# Altium PCB PCI Express_16765X6890_64PIN_Low profile_Clear.PCBDOC (part 3 of 9)
Units mm, origin at the board's own origin, x right, y up, seen from the top; angles counter-clockwise.
Board outline 80.71 x 137.84 mm, 6 copper layers (Top Layer, Layer 2 (GND), Layer 3, Layer 4, Layer 5 (AGND), Bottom Layer), stack 1.571 mm thick; 507 components, 297 nets, 1544 pads, 616 vias.
Unrouted connection lines stored in the file: 101.
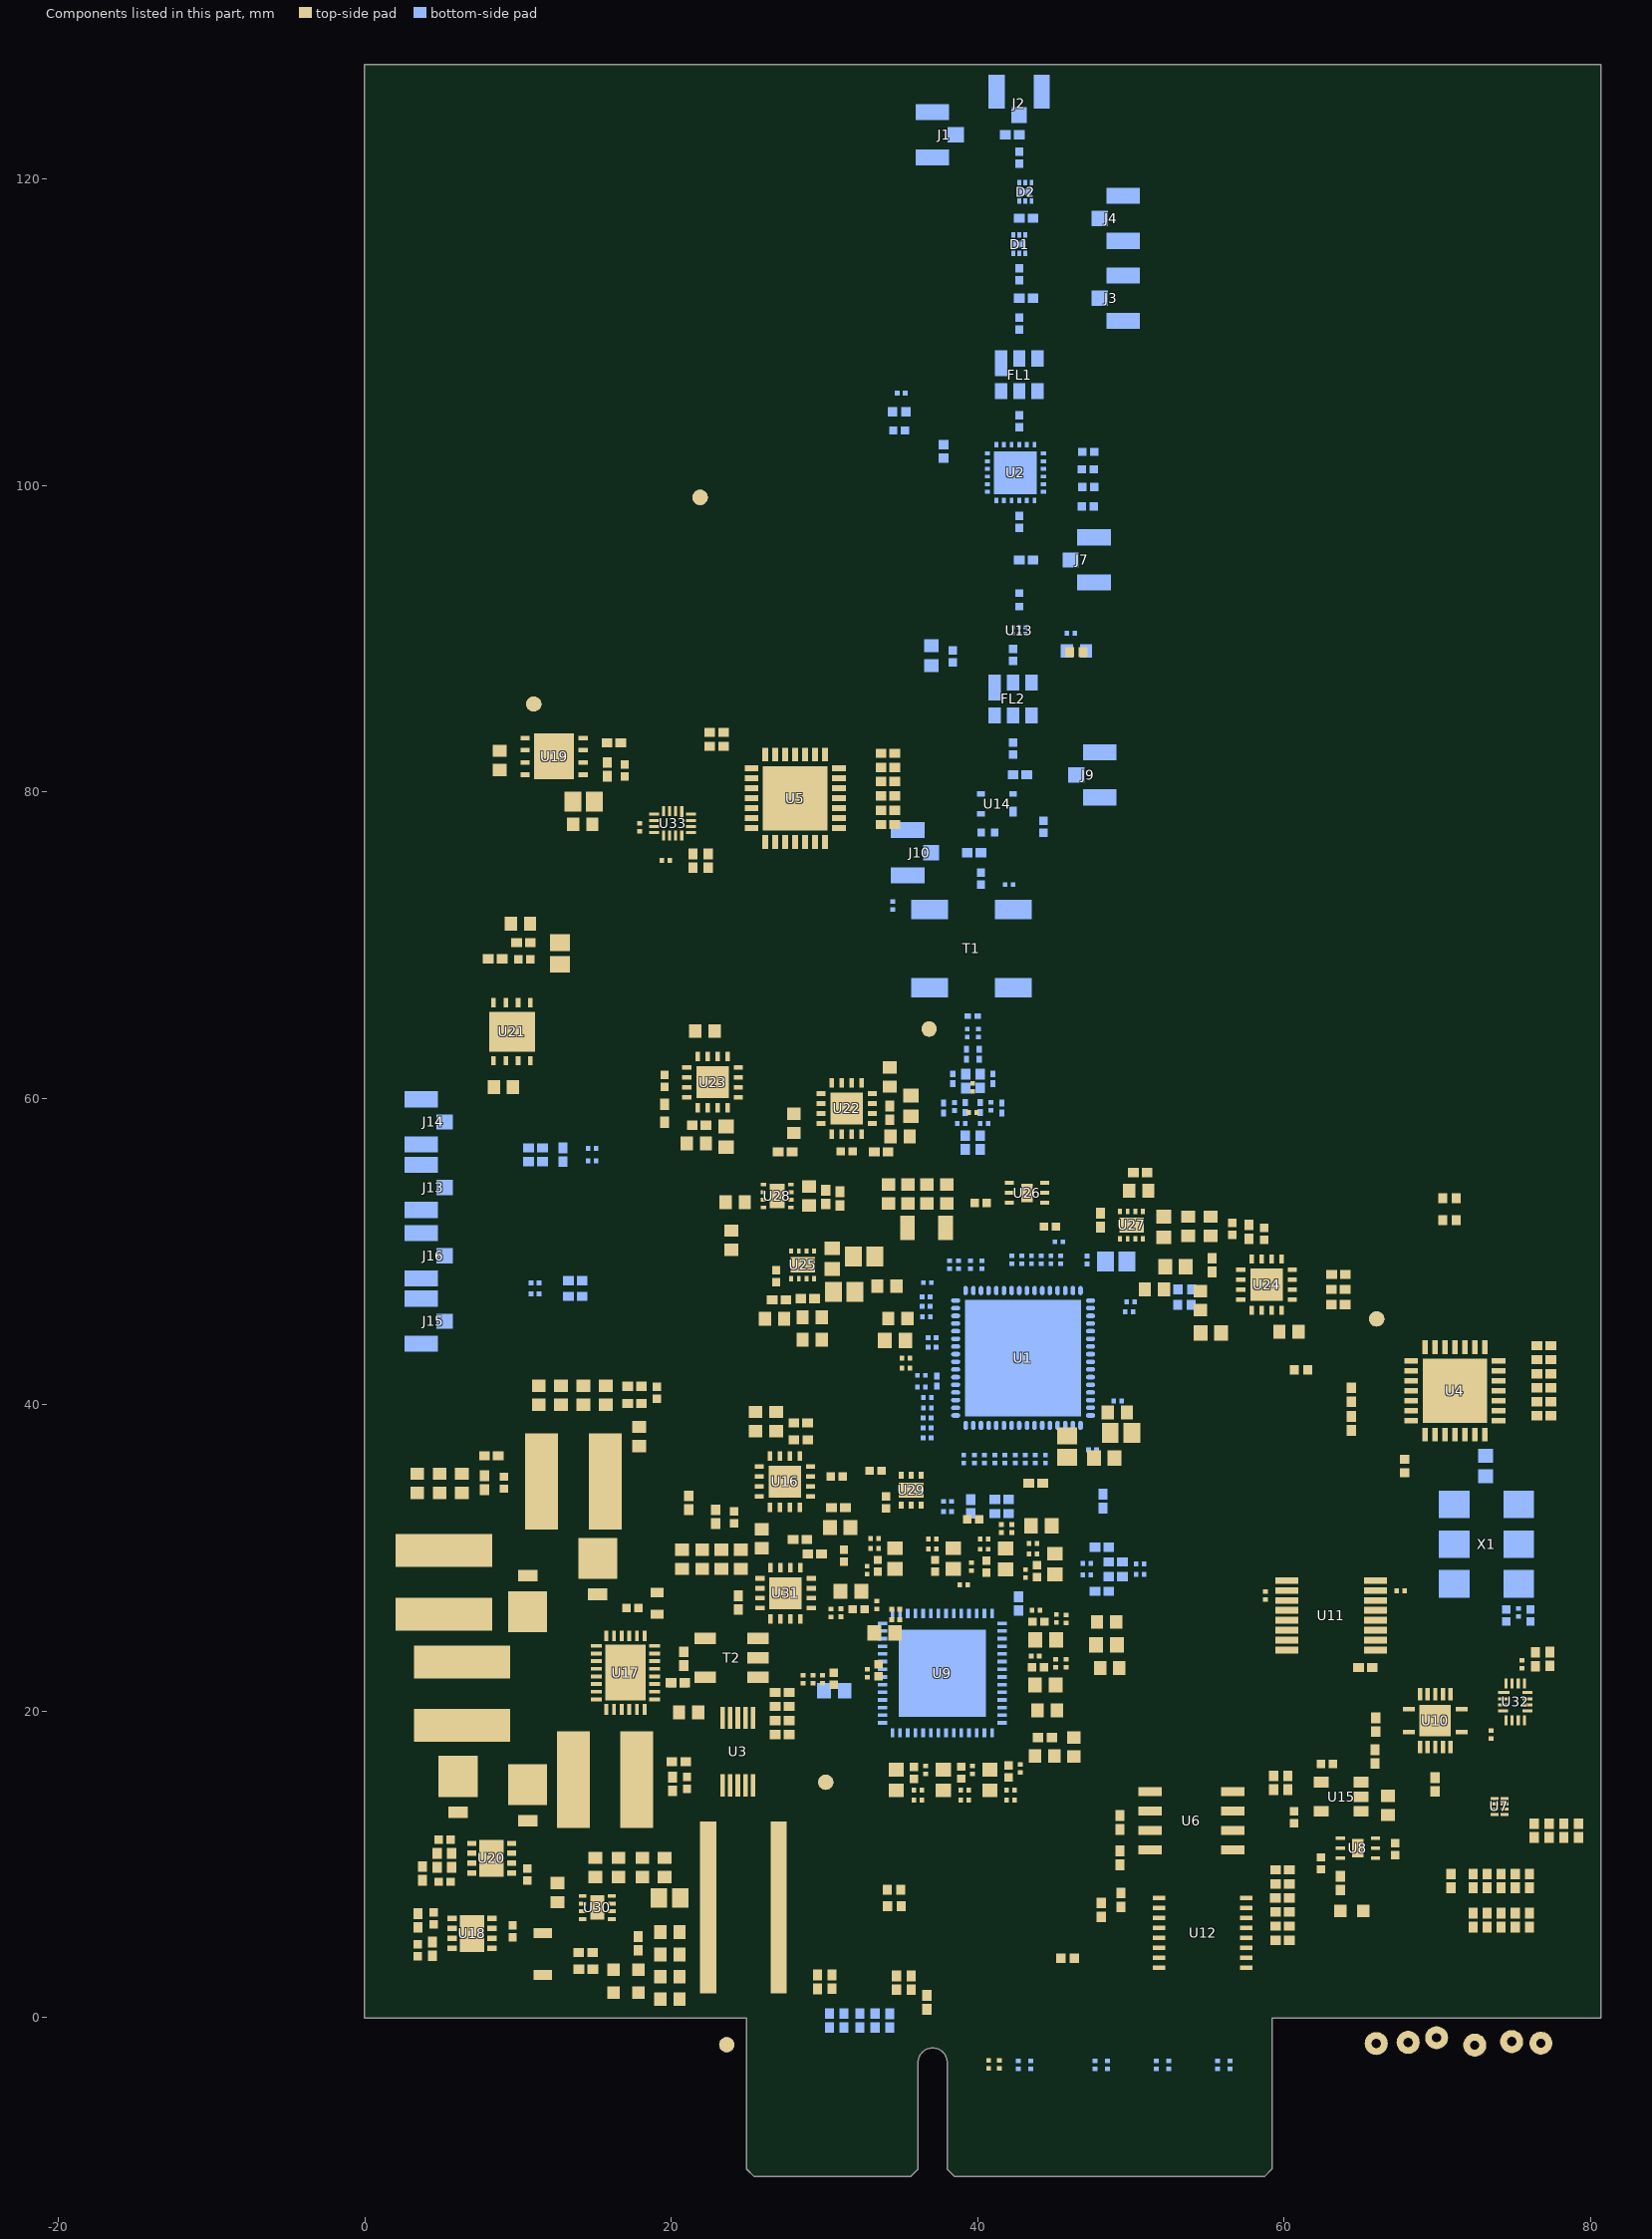
[diagram p4: the components of this part, seen from the top]

## Part data (continued)
C66: library part Capacitor, Case/Package=0402, Case Code (Metric)=1005, Dielectric=X7R, Manufacturer 1=Samsung, Manufacturer Part Number 1=CL05B681KB5NNNC, Max Operating Temperature=125°C, Min Operating Temperature=-55°C, Package Quantity=1, Supplier Part Number 1=1276-1583-1-ND, Tolerance=10%, Voltage Rating=50V, Capacitance=680pF, Case Code (Imperial)=0402, ComponentLink1Description=https://datasheet.ciiva.com/16428/cl05b681kb5nnnc-16428786.pdf?src-supplier=Future+Electronics, ComponentLink1URL=https://datasheet.ciiva.com/16428/cl05b681kb5nnnc-16428786.pdf?src-supplier=Future+Electronics, ComponentLink2Description=https://datasheet.ciiva.com/25789/cl05b681kb5nnnc-25789493.pdf?src-supplier=Digi-Key, ComponentLink2URL=https://datasheet.ciiva.com/25789/cl05b681kb5nnnc-25789493.pdf?src-supplier=Digi-Key, ComponentLink3Description=https://datasheet.ciiva.com/29198/458344-da-01-en-vs-kondensator-0402-29198504.pdf?src-supplier=Conrad, ComponentLink3URL=https://datasheet.ciiva.com/29198/458344-da-01-en-vs-kondensator-0402-29198504.pdf?src-supplier=Conrad, Depth=0.5mm, Height=0.5mm, Length=1mm, Material=Ceramic, Mount="Surface Mount", Packaging="Tape and Reel", Pricing 1="1=0.10000, 10=0.03200, 100=0.01420, 500=0.01012, 1000=0.00795, 2500=0.00722, 5000=0.00665 (USD)", Radiation Hardening=No, RoHS=Yes, Stock 1=1154024, Supplier 1=Digi-Key, Thickness=0.022inch, Width=0.02inch
C67: library part Capacitor, Case/Package=0603, Case Code (Metric)=1608, Dielectric=X7R, Dielectric Material=Ceramic, Manufacturer 1=TDK, Manufacturer Part Number 1=C1608X7R1C105K080AC, Max Operating Temperature=125°C, Min Operating Temperature=-55°C, Package Quantity=1, Supplier Part Number 1=445-1604-1-ND, Tolerance=10%, Voltage=16V, Capacitance=1uF, Case Code (Imperial)=0603, ComponentLink1Description=https://datasheet.ciiva.com/22648/1796654-22648704.pdf?src-supplier=Element14, ComponentLink1URL=https://datasheet.ciiva.com/22648/1796654-22648704.pdf?src-supplier=Element14, ComponentLink2Description=https://datasheet.ciiva.com/11788/0900766b80c1bb00-11788075.pdf?src-supplier=RSComponents, ComponentLink2URL=https://datasheet.ciiva.com/11788/0900766b80c1bb00-11788075.pdf?src-supplier=RSComponents, ComponentLink3Description=https://datasheet.ciiva.com/6250/tdkmlcccaprange-6250871.pdf?src-supplier=Digi-Key, ComponentLink3URL=https://datasheet.ciiva.com/6250/tdkmlcccaprange-6250871.pdf?src-supplier=Digi-Key, ComponentLink4Description=https://datasheet.ciiva.com/16199/e412-c-16199815.pdf?src-supplier=Future+Electronics, ComponentLink4URL=https://datasheet.ciiva.com/16199/e412-c-16199815.pdf?src-supplier=Future+Electronics, ComponentLink5Description=https://datasheet.ciiva.com/6156/1571323-6156168.pdf?src-supplier=Farnell, ComponentLink5URL=https://datasheet.ciiva.com/6156/1571323-6156168.pdf?src-supplier=Farnell, ComponentLink6Description=https://datasheet.ciiva.com/48671/e412-c-48671305.pdf?src-supplier=Avnet, ComponentLink6URL=https://datasheet.ciiva.com/48671/e412-c-48671305.pdf?src-supplier=Avnet, ComponentLink7Description=https://datasheet.ciiva.com/26285/3025c1608x7r1c105k080ac-26285242.pdf?src-supplier=Onlinecomponents.com, ComponentLink7URL=https://datasheet.ciiva.com/26285/3025c1608x7r1c105k080ac-26285242.pdf?src-supplier=Onlinecomponents.com, ComponentLink8Description=https://datasheet.ciiva.com/22749/1744655-22749595.pdf?src-supplier=Element14, ComponentLink8URL=https://datasheet.ciiva.com/22749/1744655-22749595.pdf?src-supplier=Element14, ComponentLink9Description=https://datasheet.ciiva.com/15192/getdatasheetpartid-715881-15192029.pdf?src-supplier=Verical, ComponentLink9URL=https://datasheet.ciiva.com/15192/getdatasheetpartid-715881-15192029.pdf?src-supplier=Verical, ComponentLink10Description=https://datasheet.ciiva.com/17487/e412-c-17487343.pdf?src-supplier=Avnet+Europe, ComponentLink10URL=https://datasheet.ciiva.com/17487/e412-c-17487343.pdf?src-supplier=Avnet+Europe, ComponentLink11Description=https://datasheet.ciiva.com/22694/1796654-22694127.pdf?src-supplier=Element14, ComponentLink11URL=https://datasheet.ciiva.com/22694/1796654-22694127.pdf?src-supplier=Element14, Composition=Ceramic, Depth=0.8mm, Height=0.8mm, Lead Free="Lead Free", Length=1.6mm, Mount="Surface Mount", Packaging="Tape and Reel", Pricing 1="1=0.15000, 10=0.10500, 100=0.04950, 500=0.03472, 1000=0.02875 (USD)", Radiation Hardening=No, REACH SVHC="No SVHC", RoHS=Yes, Stock 1=314791, Supplier 1=Digi-Key, Termination=SMD/SMT, Thickness=0.037inch, Voltage Rating=16V, Voltage Rating (DC)=16V, Weight=7.1E-05oz, Width=0.031inch
C68 C74: library part Capacitor, Case/Package=0805, Case Code (Metric)=2012, Dielectric=X5R, Dielectric Material=Ceramic, Manufacturer 1=KEMET, Manufacturer Part Number 1=C0805C106K8PACTU, Max Operating Temperature=85°C, Min Operating Temperature=-55°C, Package Quantity=1, Supplier Part Number 1=399-4925-1-ND, Tolerance=10%, Voltage=10V, Capacitance=10uF, Case Code (Imperial)=0805, ComponentLink1Description=https://datasheet.ciiva.com/7842/1732709-7842198.pdf?src-supplier=Element14, ComponentLink1URL=https://datasheet.ciiva.com/7842/1732709-7842198.pdf?src-supplier=Element14, ComponentLink2Description=https://datasheet.ciiva.com/22704/1732709-22704859.pdf?src-supplier=Element14, ComponentLink2URL=https://datasheet.ciiva.com/22704/1732709-22704859.pdf?src-supplier=Element14, Contact Plating=Tin,Matte, Depth=1.25mm, Dissipation Factor=10%, Height=1.25mm, Length=2mm, Mount="Surface Mount", Number of Pins=2, Packaging="Tape and Reel", Pricing 1="1=0.16000, 10=0.11700, 100=0.05500, 500=0.03858, 1000=0.03194 (USD)", Radiation Hardening=No, REACH SVHC="No SVHC", RoHS=Yes, Stock 1=697277, Supplier 1=Digi-Key, Termination=SMD/SMT, Thickness=0.055inch, Voltage Rating=10V, Voltage Rating (DC)=10V, Width=1.2mm
C71 C75: library part Capacitor, Case/Package=0603, Case Code (Metric)=1608, Dielectric=C0G, Manufacturer 1=Murata, Manufacturer Part Number 1=GRM1885C1H103JA01D, Max Operating Temperature=125°C, Min Operating Temperature=-55°C, Package Quantity=4000, Supplier Part Number 1=490-9666-1-ND, Tolerance=5%, Voltage=50V, Capacitance=10nF, Case Code (Imperial)=0603, ComponentLink1Description=https://datasheet.ciiva.com/29537/partnumbering-e-01-29537910.pdf?src-supplier=Digi-Key, ComponentLink1URL=https://datasheet.ciiva.com/29537/partnumbering-e-01-29537910.pdf?src-supplier=Digi-Key, ComponentLink2Description=https://datasheet.ciiva.com/41860/partnumbering-e-01-41860759.pdf?src-supplier=Digi-Key, ComponentLink2URL=https://datasheet.ciiva.com/41860/partnumbering-e-01-41860759.pdf?src-supplier=Digi-Key, Depth=0.8mm, Height=0.8mm, Lead Free="Lead Free", Lead Pitch=0.5mm, Length=1.6mm, Material=Ceramic, Mount="Surface Mount", Packaging="Tape and Reel", Pricing 1="1=0.20000, 10=0.13500, 100=0.06820, 500=0.04664, 1000=0.04126 (USD)", REACH SVHC="No SVHC", RoHS=Yes, Stock 1=1084376, Supplier 1=Digi-Key, Termination=SMD/SMT, Thickness=0.035inch, Voltage Rating=50V, Voltage Rating (DC)=50V, Width=0.8mm
C72: library part Capacitor, Case/Package=0402, Case Code (Metric)=1005, Dielectric=X7R, Manufacturer 1=Samsung, Manufacturer Part Number 1=CL05B152KB5NNNC, Max Operating Temperature=125°C, Min Operating Temperature=-55°C, Package Quantity=1, Supplier Part Number 1=1276-1521-1-ND, Tolerance=10%, Voltage=50V, Capacitance=1.5nF, Case Code (Imperial)=0402, ComponentLink1Description=https://datasheet.ciiva.com/16498/cl05b152kb5nnnc-16498493.pdf?src-supplier=Future+Electronics, ComponentLink1URL=https://datasheet.ciiva.com/16498/cl05b152kb5nnnc-16498493.pdf?src-supplier=Future+Electronics, ComponentLink2Description=https://datasheet.ciiva.com/15195/getdatasheetpartid-543173-15195639.pdf?src-supplier=Verical, ComponentLink2URL=https://datasheet.ciiva.com/15195/getdatasheetpartid-543173-15195639.pdf?src-supplier=Verical, ComponentLink3Description=https://datasheet.ciiva.com/29198/459134-da-01-en-vs-kondensator-0402-29198336.pdf?src-supplier=Conrad, ComponentLink3URL=https://datasheet.ciiva.com/29198/459134-da-01-en-vs-kondensator-0402-29198336.pdf?src-supplier=Conrad, ComponentLink4Description=https://datasheet.ciiva.com/26309/mlcc-catalogdownload2013-eng-26309021.pdf?src-supplier=Distrelec, ComponentLink4URL=https://datasheet.ciiva.com/26309/mlcc-catalogdownload2013-eng-26309021.pdf?src-supplier=Distrelec, Contact Plating=Tin, Depth=0.5mm, Height=0.5mm, Length=1mm, Material=Ceramic, Mount="Surface Mount", Packaging="Tape and Reel", Pricing 1="1=0.10000, 10=0.02300, 100=0.01010, 500=0.00720, 1000=0.00566, 2500=0.00514, 5000=0.00473 (USD)", Radiation Hardening=No, RoHS=Yes, Stock 1=792853, Supplier 1=Digi-Key, Thickness=0.022inch, Voltage Rating=50V, Width=0.02inch
C90 C91 C135 C140 C141: library part Capacitor, Case/Package=0805, Case Code (Metric)=2012, Dielectric=X5R, Manufacturer 1=Murata, Manufacturer Part Number 1=GRM21BR61C106KE15L, Max Operating Temperature=85°C, Min Operating Temperature=-55°C, Package Quantity=1, Supplier Part Number 1=490-3886-1-ND, Tolerance=10%, Voltage=16V, Capacitance=10uF, Case Code (Imperial)=0805, ComponentLink1Description=https://datasheet.ciiva.com/2989/product-2989696.pdf?src-supplier=Avnet, ComponentLink1URL=https://datasheet.ciiva.com/2989/product-2989696.pdf?src-supplier=Avnet, ComponentLink2Description=https://datasheet.ciiva.com/3777/1956grm21br61c106ke1523-3777137.pdf?src-supplier=Arrow, ComponentLink2URL=https://datasheet.ciiva.com/3777/1956grm21br61c106ke1523-3777137.pdf?src-supplier=Arrow, ComponentLink3Description=https://datasheet.ciiva.com/7719/1747468-7719090.pdf?src-supplier=Element14, ComponentLink3URL=https://datasheet.ciiva.com/7719/1747468-7719090.pdf?src-supplier=Element14, ComponentLink4Description=https://datasheet.ciiva.com/23628/460993-23628598.pdf?src-supplier=Newark, ComponentLink4URL=https://datasheet.ciiva.com/23628/460993-23628598.pdf?src-supplier=Newark, ComponentLink5Description=https://datasheet.ciiva.com/29202/450891-da-01-de-vs-chip-kond-0805-10-0-uf-10pr-16-0v-x5r-29202696.pdf?src-supplier=Conrad, ComponentLink5URL=https://datasheet.ciiva.com/29202/450891-da-01-de-vs-chip-kond-0805-10-0-uf-10pr-16-0v-x5r-29202696.pdf?src-supplier=Conrad, ComponentLink6Description=https://datasheet.ciiva.com/29199/454607-da-01-en-vs-kondensator-0805-29199611.pdf?src-supplier=Conrad, ComponentLink6URL=https://datasheet.ciiva.com/29199/454607-da-01-en-vs-kondensator-0805-29199611.pdf?src-supplier=Conrad, ComponentLink7Description=https://datasheet.ciiva.com/2989/product-2989697.pdf?src-supplier=Avnet, ComponentLink7URL=https://datasheet.ciiva.com/2989/product-2989697.pdf?src-supplier=Avnet, ComponentLink8Description=https://datasheet.ciiva.com/137/partnumbering-e-01-137917.pdf?src-supplier=Digi-Key, ComponentLink8URL=https://datasheet.ciiva.com/137/partnumbering-e-01-137917.pdf?src-supplier=Digi-Key, ComponentLink9Description=https://datasheet.ciiva.com/137/partnumbering-e-01-137918.pdf?src-supplier=Digi-Key, ComponentLink9URL=https://datasheet.ciiva.com/137/partnumbering-e-01-137918.pdf?src-supplier=Digi-Key, Depth=1.25mm, Height=1.25mm, Lead Free="Lead Free", Length=2mm, Material=Ceramic, Mount="Surface Mount", Packaging="Tape and Reel", Pricing 1="1=0.32000, 10=0.21600, 100=0.12240, 500=0.08640, 1000=0.07560 (USD)", Radiation Hardening=No, REACH SVHC="No SVHC", RoHS=Yes, Stock 1=3969960, Supplier 1=Digi-Key, Termination=SMD/SMT, Thickness=0.053inch, Voltage Rating=16V, Voltage Rating (DC)=16V, Width=1.25mm
C92 C126 C142: library part Capacitor, Case/Package=0603, Case Code (Metric)=1608, Dielectric=X7R, Dielectric Material=Ceramic, Manufacturer 1="Kyocera AVX", Manufacturer Part Number 1=06031C222JAT2A, Max Operating Temperature=125°C, Min Operating Temperature=-55°C, Package Quantity=1, Supplier Part Number 1=478-3705-1-ND, Tolerance=5%, Voltage=100V, Capacitance=2.2nF, Case Code (Imperial)=0603, ComponentLink1Description=https://datasheet.ciiva.com/151/cx7r-151603.pdf?src-supplier=Digi-Key, ComponentLink1URL=https://datasheet.ciiva.com/151/cx7r-151603.pdf?src-supplier=Digi-Key, ComponentLink2Description=https://datasheet.ciiva.com/151/cx7r-151604.pdf?src-supplier=Digi-Key, ComponentLink2URL=https://datasheet.ciiva.com/151/cx7r-151604.pdf?src-supplier=Digi-Key, ComponentLink3Description=https://datasheet.ciiva.com/151/cx7r-151605.pdf?src-supplier=Digi-Key, ComponentLink3URL=https://datasheet.ciiva.com/151/cx7r-151605.pdf?src-supplier=Digi-Key, ComponentLink4Description=https://datasheet.ciiva.com/2987/cx7r-2987738.pdf?src-supplier=Avnet, ComponentLink4URL=https://datasheet.ciiva.com/2987/cx7r-2987738.pdf?src-supplier=Avnet, ComponentLink5Description=https://datasheet.ciiva.com/46383/1818074-46383885.pdf?src-supplier=Element14, ComponentLink5URL=https://datasheet.ciiva.com/46383/1818074-46383885.pdf?src-supplier=Element14, ComponentLink6Description=https://datasheet.ciiva.com/22619/1679506-22619839.pdf?src-supplier=Element14, ComponentLink6URL=https://datasheet.ciiva.com/22619/1679506-22619839.pdf?src-supplier=Element14, ComponentLink7Description=https://datasheet.ciiva.com/16287/cx7r-16287705.pdf?src-supplier=Future+Electronics, ComponentLink7URL=https://datasheet.ciiva.com/16287/cx7r-16287705.pdf?src-supplier=Future+Electronics, ComponentLink8Description=https://datasheet.ciiva.com/11538/cx7r-11538250.pdf?src-supplier=Avnet, ComponentLink8URL=https://datasheet.ciiva.com/11538/cx7r-11538250.pdf?src-supplier=Avnet, ComponentLink9Description=https://datasheet.ciiva.com/5415/cx7r-218113-5415421.pdf?src-supplier=Mouser, ComponentLink9URL=https://datasheet.ciiva.com/5415/cx7r-218113-5415421.pdf?src-supplier=Mouser, ComponentLink10Description=https://datasheet.ciiva.com/14595/70001075-14595151.pdf?src-supplier=Allied+Electronics, ComponentLink10URL=https://datasheet.ciiva.com/14595/70001075-14595151.pdf?src-supplier=Allied+Electronics, Contact Plating=Tin,Matte, Depth=0.81mm, Dissipation Factor=2.5%, Height=0.9mm, Lead Free="Lead Free", Length=1.6mm, Mount="Surface Mount,PCB", Number of Pins=2, Packaging="Tape and Reel", Pricing 1="1=0.24000, 10=0.16800, 100=0.09500, 500=0.06708, 1000=0.05870 (USD)", Radiation Hardening=No, REACH SVHC="No SVHC", RoHS=Yes, Stock 1=13864, Supplier 1=Digi-Key, Termination=SMD/SMT, Thickness=0.035inch, Voltage Rating=100V, Voltage Rating (DC)=100V, Width=0.032inch
C94 C95 C237 C238: library part Capacitor, Case/Package=0402, Case Code (Metric)=1005, Dielectric=X5R, Manufacturer 1=Samsung, Manufacturer Part Number 1=CL05A474KP5NNNC, Max Operating Temperature=85°C, Min Operating Temperature=-55°C, Supplier Part Number 1=1276-1173-1-ND, Tolerance=10%, Voltage Rating=10V, Capacitance=470nF, Case Code (Imperial)=0402, ComponentLink1Description=https://datasheet.ciiva.com/25710/cl05a474kp5nnnc-25710324.pdf?src-supplier=Digi-Key, ComponentLink1URL=https://datasheet.ciiva.com/25710/cl05a474kp5nnnc-25710324.pdf?src-supplier=Digi-Key, ComponentLink2Description=https://datasheet.ciiva.com/26838/getdatasheetpartid-355286-26838191.pdf?src-supplier=Verical, ComponentLink2URL=https://datasheet.ciiva.com/26838/getdatasheetpartid-355286-26838191.pdf?src-supplier=Verical, ComponentLink3Description=https://datasheet.ciiva.com/16437/cl05b104kq5nnnc-16437351.pdf?src-supplier=Future+Electronics, ComponentLink3URL=https://datasheet.ciiva.com/16437/cl05b104kq5nnnc-16437351.pdf?src-supplier=Future+Electronics, Depth=0.5mm, Height=0.5mm, Lead Free="Lead Free", Length=1mm, Mount="Surface Mount", Packaging="Tape and Reel", Pricing 1="1=0.10000, 10=0.07000, 100=0.03140, 500=0.02240, 1000=0.01761, 2500=0.01600, 5000=0.01472 (USD)", Radiation Hardening=No, RoHS=Yes, Stock 1=1267992, Supplier 1=Digi-Key, Thickness=0.022inch, Voltage Rating (DC)=10V, Width=0.02inch
C96 C128 C170: library part Capacitor, Case/Package=0402, Case Code (Metric)=1005, Dielectric=X5R, Dielectric Material=Ceramic, Manufacturer 1=Yageo, Manufacturer Part Number 1=CC0402KRX5R5BB105, Max Operating Temperature=85°C, Min Operating Temperature=-55°C, Package Quantity=1, Supplier Part Number 1=311-1438-1-ND, Tolerance=10%, Voltage Rating=6.3V, Capacitance=1uF, Case Code (Imperial)=0402, ComponentLink1Description=https://datasheet.ciiva.com/5789/70765-5789520.pdf?src-supplier=Farnell, ComponentLink1URL=https://datasheet.ciiva.com/5789/70765-5789520.pdf?src-supplier=Farnell, ComponentLink2Description=https://datasheet.ciiva.com/176/mlccorderingcode-176611.pdf?src-supplier=Digi-Key, ComponentLink2URL=https://datasheet.ciiva.com/176/mlccorderingcode-176611.pdf?src-supplier=Digi-Key, ComponentLink3Description=https://datasheet.ciiva.com/8033/1525783-8033643.pdf?src-supplier=Element14, ComponentLink3URL=https://datasheet.ciiva.com/8033/1525783-8033643.pdf?src-supplier=Element14, ComponentLink4Description=https://datasheet.ciiva.com/16624/upy-gphc-x5r-4v-to-50v-12-16624731.pdf?src-supplier=Avnet+Europe, ComponentLink4URL=https://datasheet.ciiva.com/16624/upy-gphc-x5r-4v-to-50v-12-16624731.pdf?src-supplier=Avnet+Europe, ComponentLink5Description=https://datasheet.ciiva.com/28450/1359354-28450285.pdf?src-supplier=Element14, ComponentLink5URL=https://datasheet.ciiva.com/28450/1359354-28450285.pdf?src-supplier=Element14, ComponentLink6Description=https://datasheet.ciiva.com/11464/upy-gphc-x5r-4v-to-50v-12-11464863.pdf?src-supplier=Avnet, ComponentLink6URL=https://datasheet.ciiva.com/11464/upy-gphc-x5r-4v-to-50v-12-11464863.pdf?src-supplier=Avnet, ComponentLink7Description=https://datasheet.ciiva.com/176/mlccorderingcode-176609.pdf?src-supplier=Digi-Key, ComponentLink7URL=https://datasheet.ciiva.com/176/mlccorderingcode-176609.pdf?src-supplier=Digi-Key, ComponentLink8Description=https://datasheet.ciiva.com/176/mlccorderingcode-176610.pdf?src-supplier=Digi-Key, ComponentLink8URL=https://datasheet.ciiva.com/176/mlccorderingcode-176610.pdf?src-supplier=Digi-Key, ComponentLink9Description=https://datasheet.ciiva.com/8033/1525783-8033644.pdf?src-supplier=Element14, ComponentLink9URL=https://datasheet.ciiva.com/8033/1525783-8033644.pdf?src-supplier=Element14, ComponentLink10Description=https://datasheet.ciiva.com/8033/70765-8033646.pdf?src-supplier=Element14, ComponentLink10URL=https://datasheet.ciiva.com/8033/70765-8033646.pdf?src-supplier=Element14, Composition=Ceramic, Depth=0.5mm, Halogen Free="Halogen Free", Height=0.5mm, Lead Free="Lead Free", Length=1mm, Mount="Surface Mount", Number of Pins=2, Packaging="Tape and Reel", Radiation Hardening=No, REACH SVHC="No SVHC", RoHS=Yes, Supplier 1=Digi-Key, Termination=SMD/SMT, Thickness=0.022inch, Voltage Rating (DC)=6.3V, Width=0.02inch
  C96 C128: Pricing 1="1=0.10000, 10=0.04900, 100=0.02190, 500=0.01566, 1000=0.01230, 2500=0.01118, 5000=0.01029 (USD)", Stock 1=41037296
  C170: Pricing 1="1=0.10000, 10=0.04700, 100=0.02090, 500=0.01492, 1000=0.01172, 2500=0.01065, 5000=0.00980 (USD)", Stock 1=41031686
C97 C129: library part Capacitor, Case/Package=0603, Case Code (Metric)=1608, Dielectric=X5R, Manufacturer 1=Samsung, Manufacturer Part Number 1=CL10A106MQ8NNNC, Max Operating Temperature=85°C, Min Operating Temperature=-55°C, Package Quantity=1, Supplier Part Number 1=1276-1119-1-ND, Tolerance=20%, Voltage=6.3V, Capacitance=10uF, Case Code (Imperial)=0603, ComponentLink1Description=https://datasheet.ciiva.com/25798/cl10a106mq8nnnc-25798320.pdf?src-supplier=Digi-Key, ComponentLink1URL=https://datasheet.ciiva.com/25798/cl10a106mq8nnnc-25798320.pdf?src-supplier=Digi-Key, ComponentLink2Description=https://datasheet.ciiva.com/26838/getdatasheetpartid-357557-26838347.pdf?src-supplier=Verical, ComponentLink2URL=https://datasheet.ciiva.com/26838/getdatasheetpartid-357557-26838347.pdf?src-supplier=Verical, ComponentLink3Description=https://datasheet.ciiva.com/16437/cl05b104kq5nnnc-16437327.pdf?src-supplier=Future+Electronics, ComponentLink3URL=https://datasheet.ciiva.com/16437/cl05b104kq5nnnc-16437327.pdf?src-supplier=Future+Electronics, Contact Plating=Tin, Depth=0.8mm, Height=0.8mm, Length=1.6mm, Mount="Surface Mount", Packaging="Tape and Reel", Pricing 1="1=0.15000, 10=0.10900, 100=0.05130, 500=0.03600, 1000=0.02980 (USD)", Radiation Hardening=No, RoHS=Yes, Stock 1=2849619, Supplier 1=Digi-Key, Thickness=0.035inch, Voltage Rating=6.3V, Width=0.031inch
C144: library part Capacitor, Case/Package=0603, Case Code (Metric)=1608, Dielectric=X5R, Manufacturer 1=Murata, Manufacturer Part Number 1=GRM188R60J106KE47D, Max Operating Temperature=85°C, Min Operating Temperature=-55°C, Package Quantity=4000, Supplier Part Number 1=490-12538-1-ND, Tolerance=10%, Voltage Rating=6.3V, Capacitance=10uF, Case Code (Imperial)=0603, ComponentLink1Description=http://components.arrow.com/part/dataview/0323_06977919?src-supplier=Arrow+Europe, ComponentLink1URL=http://components.arrow.com/part/dataview/0323_06977919?src-supplier=Arrow+Europe, ComponentLink2Description=http://www.farnell.com/datasheets/1955679.pdf?src-supplier=Farnell, ComponentLink2URL=http://www.farnell.com/datasheets/1955679.pdf?src-supplier=Farnell, ComponentLink3Description=http://www.mouser.com/ds/2/281/c02e-2905.pdf?src-supplier=Mouser, ComponentLink3URL=http://www.mouser.com/ds/2/281/c02e-2905.pdf?src-supplier=Mouser, ComponentLink4Description=http://search.murata.co.jp/Ceramy/image/img/A01X/G101/ENG/GRM188R60J106KE47-02.pdf?src-supplier=Digi-Key, ComponentLink4URL=http://search.murata.co.jp/Ceramy/image/img/A01X/G101/ENG/GRM188R60J106KE47-02.pdf?src-supplier=Digi-Key, ComponentLink5Description=http://www.farnell.com/datasheets/1955679.pdf?src-supplier=Newark, ComponentLink5URL=http://www.farnell.com/datasheets/1955679.pdf?src-supplier=Newark, ComponentLink6Description=http://www.farnell.com/datasheets/1955679.pdf?src-supplier=Element14, ComponentLink6URL=http://www.farnell.com/datasheets/1955679.pdf?src-supplier=Element14, ComponentLink7Description=http://psearch.en.murata.com/capacitor/product/GRM188R60J106KE47%23.pdf?src-supplier=Avnet, ComponentLink7URL=http://psearch.en.murata.com/capacitor/product/GRM188R60J106KE47%23.pdf?src-supplier=Avnet, Depth=0.8mm, Height=0.8mm, Length=1.6mm, Material=Ceramic, Mount="Surface Mount", Packaging="Tape and Reel", Pricing 1="1=0.17000, 10=0.11800, 100=0.05990, 500=0.04098, 1000=0.03625 (USD)", REACH SVHC="No SVHC", RoHS=Yes, Stock 1=392941, Supplier 1=Digi-Key, Termination=SMD/SMT, Thickness=0.035inch, Voltage Rating (DC)=6.3V, Weight=0.000222oz, Width=0.031inch
C145 C146: library part Capacitor, Case/Package=0603, Case Code (Metric)=1608, Dielectric=X5R, Manufacturer 1=Murata, Manufacturer Part Number 1=GRM188R60J106ME47D, Max Operating Temperature=85°C, Min Operating Temperature=-55°C, Package Quantity=4000, Supplier Part Number 1=490-3896-1-ND, Tolerance=20%, Voltage=6.3V, Capacitance=10uF, Case Code (Imperial)=0603, ComponentLink1Description=https://datasheet.ciiva.com/22776/1747457-22776418.pdf?src-supplier=Farnell, ComponentLink1URL=https://datasheet.ciiva.com/22776/1747457-22776418.pdf?src-supplier=Farnell, ComponentLink2Description=https://datasheet.ciiva.com/3777/10175grm188r60j106me4723-3777268.pdf?src-supplier=Arrow, ComponentLink2URL=https://datasheet.ciiva.com/3777/10175grm188r60j106me4723-3777268.pdf?src-supplier=Arrow, ComponentLink3Description=https://datasheet.ciiva.com/28584/415295-28584232.pdf?src-supplier=Element14, ComponentLink3URL=https://datasheet.ciiva.com/28584/415295-28584232.pdf?src-supplier=Element14, ComponentLink4Description=https://datasheet.ciiva.com/29202/450781-da-01-de-vs-chip-kond-0603-10-0-uf-20pr-6-3v-x5r-29202806.pdf?src-supplier=Conrad, ComponentLink4URL=https://datasheet.ciiva.com/29202/450781-da-01-de-vs-chip-kond-0603-10-0-uf-20pr-6-3v-x5r-29202806.pdf?src-supplier=Conrad, ComponentLink5Description=https://datasheet.ciiva.com/138/partnumbering-e-01-138658.pdf?src-supplier=Digi-Key, ComponentLink5URL=https://datasheet.ciiva.com/138/partnumbering-e-01-138658.pdf?src-supplier=Digi-Key, ComponentLink6Description=https://datasheet.ciiva.com/138/partnumbering-e-01-138659.pdf?src-supplier=Digi-Key, ComponentLink6URL=https://datasheet.ciiva.com/138/partnumbering-e-01-138659.pdf?src-supplier=Digi-Key, ComponentLink7Description=https://datasheet.ciiva.com/138/partnumbering-e-01-138660.pdf?src-supplier=Digi-Key, ComponentLink7URL=https://datasheet.ciiva.com/138/partnumbering-e-01-138660.pdf?src-supplier=Digi-Key, ComponentLink8Description=https://datasheet.ciiva.com/14116/grmseries-highdielectrictype-eng-14116428.pdf?src-supplier=Distrelec, ComponentLink8URL=https://datasheet.ciiva.com/14116/grmseries-highdielectrictype-eng-14116428.pdf?src-supplier=Distrelec, ComponentLink9Description=https://datasheet.ciiva.com/16373/l0005e-16373580.pdf?src-supplier=Future+Electronics, ComponentLink9URL=https://datasheet.ciiva.com/16373/l0005e-16373580.pdf?src-supplier=Future+Electronics, Depth=0.8mm, Height=0.8mm, Lead Free="Lead Free", Length=1.6mm, Material=Ceramic, Mount="Surface Mount", Packaging="Tape and Reel", Pricing 1="1=0.37000, 10=0.25900, 100=0.15530, 500=0.11644, 1000=0.09833 (USD)", Radiation Hardening=No, REACH SVHC="No SVHC", RoHS=Yes, Stock 1=21351742, Supplier 1=Digi-Key, Termination=SMD/SMT, Thickness=0.035inch, Voltage Rating=6.3V, Voltage Rating (DC)=6.3V, Width=0.031inch
C148: library part Capacitor, Case/Package=0603, Case Code (Metric)=1608, Dielectric=X5R, Manufacturer 1=Samsung, Manufacturer Part Number 1=CL10A226MQ8NRNC, Max Operating Temperature=85°C, Min Operating Temperature=-55°C, Package Quantity=1, Supplier Part Number 1=1276-1193-1-ND, Tolerance=20%, Voltage=6.3V, Capacitance=22uF, Case Code (Imperial)=0603, ComponentLink1Description=https://datasheet.ciiva.com/26838/getdatasheetpartid-353311-26838372.pdf?src-supplier=Verical, ComponentLink1URL=https://datasheet.ciiva.com/26838/getdatasheetpartid-353311-26838372.pdf?src-supplier=Verical, ComponentLink2Description=https://datasheet.ciiva.com/25790/cl10a226mq8nrnc-25790695.pdf?src-supplier=Digi-Key, ComponentLink2URL=https://datasheet.ciiva.com/25790/cl10a226mq8nrnc-25790695.pdf?src-supplier=Digi-Key, ComponentLink3Description=https://datasheet.ciiva.com/29198/457121-da-01-en-vs-kondensator-0603-29198747.pdf?src-supplier=Conrad, ComponentLink3URL=https://datasheet.ciiva.com/29198/457121-da-01-en-vs-kondensator-0603-29198747.pdf?src-supplier=Conrad, ComponentLink4Description=https://datasheet.ciiva.com/16437/cl05b104kq5nnnc-16437317.pdf?src-supplier=Future+Electronics, ComponentLink4URL=https://datasheet.ciiva.com/16437/cl05b104kq5nnnc-16437317.pdf?src-supplier=Future+Electronics, Contact Plating=Tin, Depth=0.8mm, Height=0.8mm, Length=1.6mm, Material=Ceramic, Mount="Surface Mount", Packaging="Tape and Reel", Pricing 1="1=0.30000, 10=0.20500, 100=0.11590, 500=0.08182, 1000=0.07159 (USD)", Radiation Hardening=No, RoHS=Yes, Stock 1=1447667, Supplier 1=Digi-Key, Thickness=0.039inch, Voltage Rating=6.3V, Width=0.031inch
C149: library part Capacitor, Case/Package=0805, Case Code (Metric)=2012, Dielectric=X5R, Manufacturer 1=Samsung, Manufacturer Part Number 1=CL21A106KOQNNNG, Max Operating Temperature=85°C, Min Operating Temperature=-55°C, Package Quantity=3000, Supplier Part Number 1=1276-6455-1-ND, Tolerance=10%, Voltage=16V, Capacitance=10uF, Case Code (Imperial)=0805, ComponentLink1Description=https://datasheet.ciiva.com/25730/cl21a106koqnnng-25730226.pdf?src-supplier=Digi-Key, ComponentLink1URL=https://datasheet.ciiva.com/25730/cl21a106koqnnng-25730226.pdf?src-supplier=Digi-Key, ComponentLink2Description=https://datasheet.ciiva.com/29199/454932-da-01-en-vs-kondensator-0805-29199423.pdf?src-supplier=Conrad, ComponentLink2URL=https://datasheet.ciiva.com/29199/454932-da-01-en-vs-kondensator-0805-29199423.pdf?src-supplier=Conrad, Depth=1.25mm, Height=1.25mm, Length=2mm, Material=Ceramic, Mount="Surface Mount", Packaging="Tape and Reel", Pricing 1="1=0.15000, 10=0.10800, 100=0.05100, 500=0.03576, 1000=0.02961 (USD)", RoHS=Yes, Stock 1=326474, Supplier 1=Digi-Key, Thickness=0.053inch, Voltage Rating=16V, Width=0.049inch
C168 C169: library part Capacitor, Case/Package=0402, Case Code (Metric)=1005, Manufacturer 1=Murata, Manufacturer Part Number 1=GRJ155R60J106ME11D, Max Operating Temperature=85°C, Min Operating Temperature=-55°C, Supplier Part Number 1=490-13211-1-ND, Tolerance=20%, Voltage Rating=6.3V, Capacitance=10uF, Case Code (Imperial)=0402, ComponentLink1Description=http://psearch.en.murata.com/capacitor/product/GRJ155R60J106ME11%23.pdf?src-supplier=Digi-Key, ComponentLink1URL=http://psearch.en.murata.com/capacitor/product/GRJ155R60J106ME11%23.pdf?src-supplier=Digi-Key, Features="Soft Termination", Length=0.039inch, Mount="Surface Mount", Packaging="Cut Tape", Pricing 1="1=0.22000, 10=0.15100, 100=0.07660, 500=0.05242, 1000=0.04637, 2500=0.04435, 5000=0.04032 (USD)", RoHS=Yes, Stock 1=824366, Supplier 1=Digi-Key, Thickness=0.028inch, Width=0.02inch
C171 C172 C173: library part Capacitor, Case/Package=0603, Case Code (Metric)=1608, Manufacturer 1="Taiyo Yuden", Manufacturer Part Number 1=JMK107ABJ106KA-T, Max Operating Temperature=85°C, Min Operating Temperature=-55°C, Supplier Part Number 1=587-6012-1-ND, Tolerance=10%, Voltage Rating=6.3V, Capacitance=10uF, Case Code (Imperial)=0603, ComponentLink1Description="https://ds.yuden.co.jp/TYCOMPAS/ut/detail?pn=JMK107ABJ106KA-T &amp;u=M&src-supplier=Digi-Key", ComponentLink1URL="https://ds.yuden.co.jp/TYCOMPAS/ut/detail?pn=JMK107ABJ106KA-T &amp;u=M&src-supplier=Digi-Key", ComponentLink2Description=http://ds.yuden.co.jp/TYCOMPAS/ut/detail.do?productNo=JMK107ABJ106KA-T&amp;fileName=JMK107ABJ106KA-T_SS&amp;mode=specSheetDownload&src-supplier=Digi-Key, ComponentLink2URL=http://ds.yuden.co.jp/TYCOMPAS/ut/detail.do?productNo=JMK107ABJ106KA-T&amp;fileName=JMK107ABJ106KA-T_SS&amp;mode=specSheetDownload&src-supplier=Digi-Key, Mount="Surface Mount", Packaging="Cut Tape", Pricing 1="1=0.15000, 10=0.10500, 100=0.04940, 500=0.03462, 1000=0.02866 (USD)", RoHS=No, Stock 1=50983, Supplier 1=Digi-Key
C177: library part Capacitor, Case/Package=0402, Case Code (Metric)=1005, Dielectric=C0G, Dielectric Material=Ceramic, Manufacturer 1=KEMET, Manufacturer Part Number 1=C0402C101J5GACAUTO, Max Operating Temperature=125°C, Min Operating Temperature=-55°C, Package Quantity=10000, Ratings=AEC-Q200, Supplier Part Number 1=399-6823-1-ND, Tolerance=5%, Voltage Rating=50V, Capacitance=100pF, Case Code (Imperial)=0402, ComponentLink1Description=https://datasheet.ciiva.com/26923/getdatasheetpartid-385375-26923866.pdf?src-supplier=Verical, ComponentLink1URL=https://datasheet.ciiva.com/26923/getdatasheetpartid-385375-26923866.pdf?src-supplier=Verical, Depth=0.5mm, Lead Free="Lead Free", Length=1mm, Mount="Surface Mount", Packaging="Tape and Reel", Pricing 1="1=0.11000, 10=0.08400, 100=0.03730, 500=0.02664, 1000=0.02093, 2500=0.01903, 5000=0.01751 (USD)", Radiation Hardening=No, REACH SVHC="No SVHC", RoHS=Yes, Stock 1=66452, Supplier 1=Digi-Key, Thickness=0.022inch, Voltage Rating (DC)=50V, Width=0.02inch
C230 C231: library part Capacitor, Case/Package=0402, Case Code (Metric)=1005, Dielectric=C0G, Dielectric Material=Ceramic, Manufacturer 1=KEMET, Manufacturer Part Number 1=C0402C100J3GACTU, Max Operating Temperature=125°C, Min Operating Temperature=-55°C, Package Quantity=1, Supplier Part Number 1=399-7746-1-ND, Tolerance=5%, Voltage Rating=25V, Capacitance=10pF, Case Code (Imperial)=0402, ComponentLink1Description=https://datasheet.ciiva.com/5423/kem-c1003-c0g-smd-356956-5423320.pdf?src-supplier=Mouser, ComponentLink1URL=https://datasheet.ciiva.com/5423/kem-c1003-c0g-smd-356956-5423320.pdf?src-supplier=Mouser, ComponentLink2Description=https://datasheet.ciiva.com/18100/getdatasheetpartid-36469-18100955.pdf?src-supplier=Verical, ComponentLink2URL=https://datasheet.ciiva.com/18100/getdatasheetpartid-36469-18100955.pdf?src-supplier=Verical, Depth=0.5mm, Dissipation Factor=0.1%, Height=0.5mm, Lead Free="Lead Free", Lead Pitch=0.3mm, Length=1mm, Mount="Surface Mount", Packaging="Tape and Reel", Pricing 1="1=0.10000, 10=0.02500, 100=0.01120, 500=0.00796, 1000=0.00626, 2500=0.00569, 5000=0.00524 (USD)", Radiation Hardening=No, REACH SVHC="No SVHC", RoHS=Yes, Stock 1=581422, Supplier 1=Digi-Key, Termination=SMD/SMT, Thickness=0.022inch, Voltage Rating (DC)=25V, Width=0.5mm
D1: "DIODE SCHOTTKY/LIMITER 6TDFN", Manufacturer="TE Connectivity MA-COM", Supplier Part Number 1=1465-1736-1-ND, ComponentLink1Description=http://cdn.macom.com//datasheets/MADL-011021-14150T.pdf?src-supplier=Digi-Key, ComponentLink1URL=http://cdn.macom.com//datasheets/MADL-011021-14150T.pdf?src-supplier=Digi-Key, Manufacturer Part Number=MADL-011021-14150T, Packaging="Tape and Reel", Pricing 1="1 = 2,43000, 10 = 2,18400, 25 = 2,06000, 100 = 1,75510, 250 = 1,64800, 500 = 1,44200, 1000 = 1,19480 (USD)", RoHS=Yes, Stock 1=7736, Supplier 1=Digi-Key
D2: "PIN Diodes .5-12GHz Ls=.4nH 100W Pk", Case/Package=DFN, Forward Current=250mA, Forward Voltage=900mV, Manufacturer="TE Connectivity MA-COM", Max Operating Temperature=125°C, Max Power Dissipation=7.5W, Min Operating Temperature=-65°C, Package Quantity=3000, Reverse Voltage (DC)=400V, Supplier Part Number 1=1465-1738-1-ND, ComponentLink1Description=https://datasheet.ciiva.com/24021/madp-011029-14150t-257701-24021442.pdf?src-supplier=Mouser, ComponentLink1URL=https://datasheet.ciiva.com/24021/madp-011029-14150t-257701-24021442.pdf?src-supplier=Mouser, Diode Type="PIN - Single", Element Configuration=Single, Manufacturer Part Number=MADP-011029-14150T, Max Current Rating=250mA, Packaging="Tape and Reel", Pricing 1="1 = 2,89000, 10 = 2,59800, 25 = 2,45640, 100 = 2,12900, 250 = 2,01984, 500 = 1,81238, 1000 = 1,52852 (USD)", RoHS=Yes, Stock 1=6865, Supplier 1=Digi-Key, Termination=Solder, Weight=0.000744oz
D3 D4 D5 D6: library part MBRM140T1G, Supplier Part Number 1=MBRM140T3GOSCT-ND, Supplier 1=Digi-Key
D7 D8 D9: "LED,  LTST-C190GKT", Case/Package=0603, Case Code (Metric)=1608, Color=Green, Forward Current=30mA, Forward Voltage=2.1V, Lens Color=Colorless, Manufacturer 1="Vishay Lite-On", Max Operating Temperature=85°C, Min Operating Temperature=-55°C, Package Quantity=1, Power Dissipation=100mW, Reverse Voltage=5V, Supplier Part Number 1=160-1183-1-ND, Test Current=10mA, Voltage=2V, Case Code (Imperial)=0603, ComponentLink1Description=https://datasheet.ciiva.com/11775/0900766b80dc02a6-11775616.pdf?src-supplier=RSComponents, ComponentLink1URL=https://datasheet.ciiva.com/11775/0900766b80dc02a6-11775616.pdf?src-supplier=RSComponents, ComponentLink2Description=https://datasheet.ciiva.com/2109/ltst-c190gkt-2109985.pdf?src-supplier=Digi-Key, ComponentLink2URL=https://datasheet.ciiva.com/2109/ltst-c190gkt-2109985.pdf?src-supplier=Digi-Key, ComponentLink3Description=https://datasheet.ciiva.com/16392/lite-on20ltst-c190gkt-16392818.pdf?src-supplier=Future+Electronics, ComponentLink3URL=https://datasheet.ciiva.com/16392/lite-on20ltst-c190gkt-16392818.pdf?src-supplier=Future+Electronics, ComponentLink4Description=https://datasheet.ciiva.com/12403/lite-on-ltst-c190gkt-187204-12403884.pdf?src-supplier=Mouser, ComponentLink4URL=https://datasheet.ciiva.com/12403/lite-on-ltst-c190gkt-187204-12403884.pdf?src-supplier=Mouser, ComponentLink5Description=https://datasheet.ciiva.com/2109/ltst-c190gkt-2109986.pdf?src-supplier=Digi-Key, ComponentLink5URL=https://datasheet.ciiva.com/2109/ltst-c190gkt-2109986.pdf?src-supplier=Digi-Key, ComponentLink6Description=https://datasheet.ciiva.com/2109/ltst-c190gkt-2109987.pdf?src-supplier=Digi-Key, ComponentLink6URL=https://datasheet.ciiva.com/2109/ltst-c190gkt-2109987.pdf?src-supplier=Digi-Key, Depth=0.8mm, Dominant Wavelength=569nm, Height=0.8mm, Illumination Color=Green, Lead Free="Lead Free", Length=1.6mm, Lens Style=Clear,Diffused,Colorless,Rectangular, Lens Transparency=Clear, Luminous Intensity=6mcd, Manufacturer Part Number 1=LTST-C190GKT, Mount="Surface Mount", Number of Elements=1, Number of LEDs=1, Number of Pins=2, Packaging="Tape and Reel", Power Rating=100mW, Pricing 1="1=0.26000, 10=0.18800, 100=0.08880, 500=0.05922, 1000=0.04639 (USD)", Radiation Hardening=No, RoHS=Yes, Stock 1=908158, Supplier 1=Digi-Key, Viewing Angle=130°, Wavelength=565nm, Width=0.8mm
FB1 FB2 FB3: library part Ferrite, Case/Package=0402, Case Code (Metric)=1005, Current Rating=300mA, DC Resistance (DCR)=550mR, Frequency=100MHz, Manufacturer 1=Murata, Manufacturer Part Number 1=BLM15BB121SN1D, Max Operating Temperature=125°C, Min Operating Temperature=-55°C, Package Quantity=1, Supplier Part Number 1=490-1008-1-ND, Tolerance=25%, Case Code (Imperial)=0402, ComponentLink1Description=https://datasheet.ciiva.com/1466/5145-1466832.pdf?src-supplier=Element14, ComponentLink1URL=https://datasheet.ciiva.com/1466/5145-1466832.pdf?src-supplier=Element14, ComponentLink2Description=https://datasheet.ciiva.com/41449/001172179-da-01-en-drossel-0402-120r-1-0x0-5mm-10000st-41449466.pdf?src-supplier=Conrad, ComponentLink2URL=https://datasheet.ciiva.com/41449/001172179-da-01-en-drossel-0402-120r-1-0x0-5mm-10000st-41449466.pdf?src-supplier=Conrad, ComponentLink3Description=https://datasheet.ciiva.com/1466/5145-1466833.pdf?src-supplier=Element14, ComponentLink3URL=https://datasheet.ciiva.com/1466/5145-1466833.pdf?src-supplier=Element14, ComponentLink4Description=https://datasheet.ciiva.com/3082/l0110s0100blm15b-3082680.pdf?src-supplier=Avnet, ComponentLink4URL=https://datasheet.ciiva.com/3082/l0110s0100blm15b-3082680.pdf?src-supplier=Avnet, ComponentLink5Description=https://datasheet.ciiva.com/16213/l0110s0100blm15b-16213674.pdf?src-supplier=Future+Electronics, ComponentLink5URL=https://datasheet.ciiva.com/16213/l0110s0100blm15b-16213674.pdf?src-supplier=Future+Electronics, ComponentLink6Description=https://datasheet.ciiva.com/1012/l0110s0100blm15b-1012029.pdf?src-supplier=Digi-Key, ComponentLink6URL=https://datasheet.ciiva.com/1012/l0110s0100blm15b-1012029.pdf?src-supplier=Digi-Key, ComponentLink7Description=https://datasheet.ciiva.com/1012/l0110s0100blm15b-1012030.pdf?src-supplier=Digi-Key, ComponentLink7URL=https://datasheet.ciiva.com/1012/l0110s0100blm15b-1012030.pdf?src-supplier=Digi-Key, ComponentLink8Description=https://datasheet.ciiva.com/1012/l0110s0100blm15b-1012031.pdf?src-supplier=Digi-Key, ComponentLink8URL=https://datasheet.ciiva.com/1012/l0110s0100blm15b-1012031.pdf?src-supplier=Digi-Key, Composition="Ferrite Bead", Core Material=Ferrite, Depth=0.5mm, Height=0.5mm, Impedance=120R, Lead Free="Lead Free", Length=1mm, Material=Ferrite,Steel, Max Current Rating=300mA, Max DC Current=300mA, Number of Circuits=1, Number of Lines=1, Number of Pins=2, Packaging="Tape and Reel", Pricing 1="1=0.10000, 10=0.08300, 25=0.07440, 50=0.05440, 100=0.04700, 250=0.03712, 500=0.03136, 1000=0.02640, 5000=0.02351 (USD)", REACH SVHC="No SVHC", RoHS=Yes, Shielding=Unshielded, Stock 1=178432, Supplier 1=Digi-Key, Termination=SMD/SMT, Test Frequency=100MHz, Width=0.5mm
FB4 FB10 FB12 FB13 FB14 FB29 FB30 FB35: library part Ferrite, Case/Package=0603, Case Code (Metric)=1608, Current Rating=2A, DC Resistance (DCR)=45mR, Manufacturer 1=TDK, Manufacturer Part Number 1=MPZ1608S121ATAH0, Package Quantity=4000, Supplier Part Number 1=445-5219-1-ND, Tolerance=25%, Case Code (Imperial)=0603, ComponentLink1Description=https://datasheet.ciiva.com/46634/beads-commercial-power-mpz-en-46634726.pdf?src-supplier=Digi-Key, ComponentLink1URL=https://datasheet.ciiva.com/46634/beads-commercial-power-mpz-en-46634726.pdf?src-supplier=Digi-Key, ComponentLink2Description=https://datasheet.ciiva.com/46634/beads-commercial-power-mpz-en-46634728.pdf?src-supplier=Digi-Key, ComponentLink2URL=https://datasheet.ciiva.com/46634/beads-commercial-power-mpz-en-46634728.pdf?src-supplier=Digi-Key, ComponentLink3Description=https://datasheet.ciiva.com/48682/beads-commercial-power-mpz-en-48682494.pdf?src-supplier=Avnet, ComponentLink3URL=https://datasheet.ciiva.com/48682/beads-commercial-power-mpz-en-48682494.pdf?src-supplier=Avnet, Core Material=Ferrite, Depth=0.8mm, Height=0.03inch, Impedance=120R, Length=0.063inch, Max DC Current=2A, Mount="Surface Mount", Packaging="Tape and Reel", Pricing 1="1=0.10000, 10=0.07900, 25=0.07160, 50=0.06440, 100=0.04720, 250=0.03432, 500=0.03146, 1000=0.02717 (USD)", RoHS=Yes, Stock 1=68096, Supplier 1=Digi-Key, Width=0.031inch
FB5 FB6 FB7 FB8 FB9 FB31 FB32 FB33 FB34: library part Ferrite, Case/Package=0402, Case Code (Metric)=1005, Current Rating=1.74A, DC Resistance (DCR)=15mR, Manufacturer 1=Murata, Manufacturer Part Number 1=BLM15AX100SN1D, Max Operating Temperature=125°C, Min Operating Temperature=-55°C, Package Quantity=1, Supplier Part Number 1=490-5437-1-ND, Test Frequency=100MHz, Tolerance=25%, Case Code (Imperial)=0402, ComponentLink1Description=https://datasheet.ciiva.com/41449/001172165-da-01-en-drossel-0402-10r0-1-0x0-5mm-10000st-41449453.pdf?src-supplier=Conrad, ComponentLink1URL=https://datasheet.ciiva.com/41449/001172165-da-01-en-drossel-0402-10r0-1-0x0-5mm-10000st-41449453.pdf?src-supplier=Conrad, ComponentLink2Description=https://datasheet.ciiva.com/1012/l0110e-1012384.pdf?src-supplier=Digi-Key, ComponentLink2URL=https://datasheet.ciiva.com/1012/l0110e-1012384.pdf?src-supplier=Digi-Key, ComponentLink3Description=https://datasheet.ciiva.com/1012/l0110e-1012385.pdf?src-supplier=Digi-Key, ComponentLink3URL=https://datasheet.ciiva.com/1012/l0110e-1012385.pdf?src-supplier=Digi-Key, ComponentLink4Description=https://datasheet.ciiva.com/1012/l0110e-1012383.pdf?src-supplier=Digi-Key, ComponentLink4URL=https://datasheet.ciiva.com/1012/l0110e-1012383.pdf?src-supplier=Digi-Key, Depth=0.5mm, Height=0.5mm, Impedance=10R, Lead Free="Lead Free", Length=1mm, Material=Ferrite,Steel, Max Current Rating=1.74A, Max DC Current=1.74A, Number of Circuits=1, Number of Lines=1, Number of Pins=2, Packaging="Tape and Reel", Pricing 1="1=0.11000, 10=0.09000, 25=0.08120, 50=0.05960, 100=0.05140, 250=0.04060, 500=0.03428, 1000=0.02886, 5000=0.02571 (USD)", REACH SVHC="No SVHC", RoHS=Yes, Stock 1=154406, Supplier 1=Digi-Key, Termination=SMD/SMT, Width=0.5mm
FB11 FB36: library part Ferrite, Case/Package=0603, Case Code (Metric)=1608, Current Rating=2A, DC Resistance (DCR)=40mR, Frequency=100MHz, Manufacturer 1=Murata, Manufacturer Part Number 1=BLM18EG121SN1D, Max Operating Temperature=125°C, Min Operating Temperature=-55°C, Package Quantity=1, Supplier Part Number 1=490-3991-6-ND, Tolerance=25%, Case Code (Imperial)=0603, ComponentLink1Description=https://datasheet.ciiva.com/34302/1844926-34302803.pdf?src-supplier=Jameco, ComponentLink1URL=https://datasheet.ciiva.com/34302/1844926-34302803.pdf?src-supplier=Jameco, ComponentLink2Description=https://datasheet.ciiva.com/11795/0900766b811b5866-11795397.pdf?src-supplier=RSComponents, ComponentLink2URL=https://datasheet.ciiva.com/11795/0900766b811b5866-11795397.pdf?src-supplier=RSComponents, ComponentLink3Description=https://datasheet.ciiva.com/41449/001171698-da-01-en-chip-drossel0603-120r-2000ma-1-6x0-8mm-41449378.pdf?src-supplier=Conrad, ComponentLink3URL=https://datasheet.ciiva.com/41449/001171698-da-01-en-chip-drossel0603-120r-2000ma-1-6x0-8mm-41449378.pdf?src-supplier=Conrad, ComponentLink4Description=https://datasheet.ciiva.com/41449/001172264-da-01-en-drossel-0603-120r-1-6x0-8mm-4000st-41449582.pdf?src-supplier=Conrad, ComponentLink4URL=https://datasheet.ciiva.com/41449/001172264-da-01-en-drossel-0603-120r-1-6x0-8mm-4000st-41449582.pdf?src-supplier=Conrad, ComponentLink5Description=https://datasheet.ciiva.com/1467/5169-1467155.pdf?src-supplier=Element14, ComponentLink5URL=https://datasheet.ciiva.com/1467/5169-1467155.pdf?src-supplier=Element14, ComponentLink6Description=https://datasheet.ciiva.com/1467/5169-1467156.pdf?src-supplier=Element14, ComponentLink6URL=https://datasheet.ciiva.com/1467/5169-1467156.pdf?src-supplier=Element14, ComponentLink7Description=https://datasheet.ciiva.com/18092/getdatasheetpartid-120977-18092965.pdf?src-supplier=Verical, ComponentLink7URL=https://datasheet.ciiva.com/18092/getdatasheetpartid-120977-18092965.pdf?src-supplier=Verical, ComponentLink8Description=https://datasheet.ciiva.com/6211/l0110s0101blm18e-6211463.pdf?src-supplier=Digi-Key, ComponentLink8URL=https://datasheet.ciiva.com/6211/l0110s0101blm18e-6211463.pdf?src-supplier=Digi-Key, ComponentLink9Description=https://datasheet.ciiva.com/16387/l0110s0101blm18e-16387655.pdf?src-supplier=Future+Electronics, ComponentLink9URL=https://datasheet.ciiva.com/16387/l0110s0101blm18e-16387655.pdf?src-supplier=Future+Electronics, ComponentLink10Description=https://datasheet.ciiva.com/3081/l0110s0101blm18e-3081624.pdf?src-supplier=Avnet, ComponentLink10URL=https://datasheet.ciiva.com/3081/l0110s0101blm18e-3081624.pdf?src-supplier=Avnet, ComponentLink11Description=https://datasheet.ciiva.com/14122/blm-series-eng-tds-14122904.pdf?src-supplier=Distrelec, ComponentLink11URL=https://datasheet.ciiva.com/14122/blm-series-eng-tds-14122904.pdf?src-supplier=Distrelec, ComponentLink12Description=https://datasheet.ciiva.com/17279/l0110s0101blm18e-17279548.pdf?src-supplier=Avnet+Europe, ComponentLink12URL=https://datasheet.ciiva.com/17279/l0110s0101blm18e-17279548.pdf?src-supplier=Avnet+Europe, Core Material=Ferrite, DC Current=2A, Depth=0.8mm, Height=0.8mm, Impedance=120R, Lead Free="Lead Free", Length=1.6mm, Material=Steel,Ferrite, Max Current Rating=2A, Max DC Current=2A, Military Standard=Not, Number of Circuits=1, Number of Lines=1, Number of Pins=2, Packaging="Tape and Reel", Pricing 1="1=0.23000, 10=0.17500, 25=0.14520, 50=0.12520, 100=0.11260, 250=0.09508, 500=0.08508, 1000=0.07257 (USD)", Radiation Hardening=No, REACH SVHC="No SVHC", RoHS=Yes, Stock 1=15177, Supplier 1=Digi-Key, Termination=SMD/SMT, Test Frequency=100MHz, Weight=7.1E-05oz, Width=0.8mm
FB15 FB16 FB17 FB18 FB19 FB20 FB22 FB23 FB24 FB25 FB26 FB27 FB28: library part Ferrite, Case/Package=0603, Case Code (Metric)=1608, Current Rating=2.5A, DC Resistance (DCR)=50mR, Manufacturer 1=Samsung, Manufacturer Part Number 1=CIS10P221NC, Max Operating Temperature=125°C, Min Operating Temperature=-55°C, Package Quantity=1, Supplier Part Number 1=1276-6350-2-ND, Tolerance=25%, Case Code (Imperial)=0603, ComponentLink1Description=https://datasheet.ciiva.com/29994/cis10p101ac-29994155.pdf?src-supplier=Avnet, ComponentLink1URL=https://datasheet.ciiva.com/29994/cis10p101ac-29994155.pdf?src-supplier=Avnet, ComponentLink2Description=https://datasheet.ciiva.com/16395/cic21-series-16395893.pdf?src-supplier=Future+Electronics, ComponentLink2URL=https://datasheet.ciiva.com/16395/cic21-series-16395893.pdf?src-supplier=Future+Electronics, Core Material=Ferrite, Depth=0.8mm, Height=0.037inch, Impedance=220R, Lead Free="Lead Free", Length=0.063inch, Max Current Rating=2.5A, Max DC Current=2.5A, Mount="Surface Mount", Number of Lines=1, Packaging="Cut Tape", Pricing 1="4000=0.00880, 8000=0.00660, 12000=0.00638, 28000=0.00616, 100000=0.00572 (USD)", Radiation Hardening=No, RoHS=Yes, Stock 1=336000, Supplier 1=Digi-Key, Width=0.031inch